# Altium PCB PMP41115.PcbDoc (part 2 of 6)
Units mm, origin at the board's own origin, x right, y up, seen from the top; angles counter-clockwise.
Board outline 102.92 x 46.74 mm, 4 copper layers (Top Layer, Signal Layer 1, Signal Layer 2, Bottom Layer), stack 1.016 mm thick; 174 components, 114 nets, 547 pads, 2622 vias.
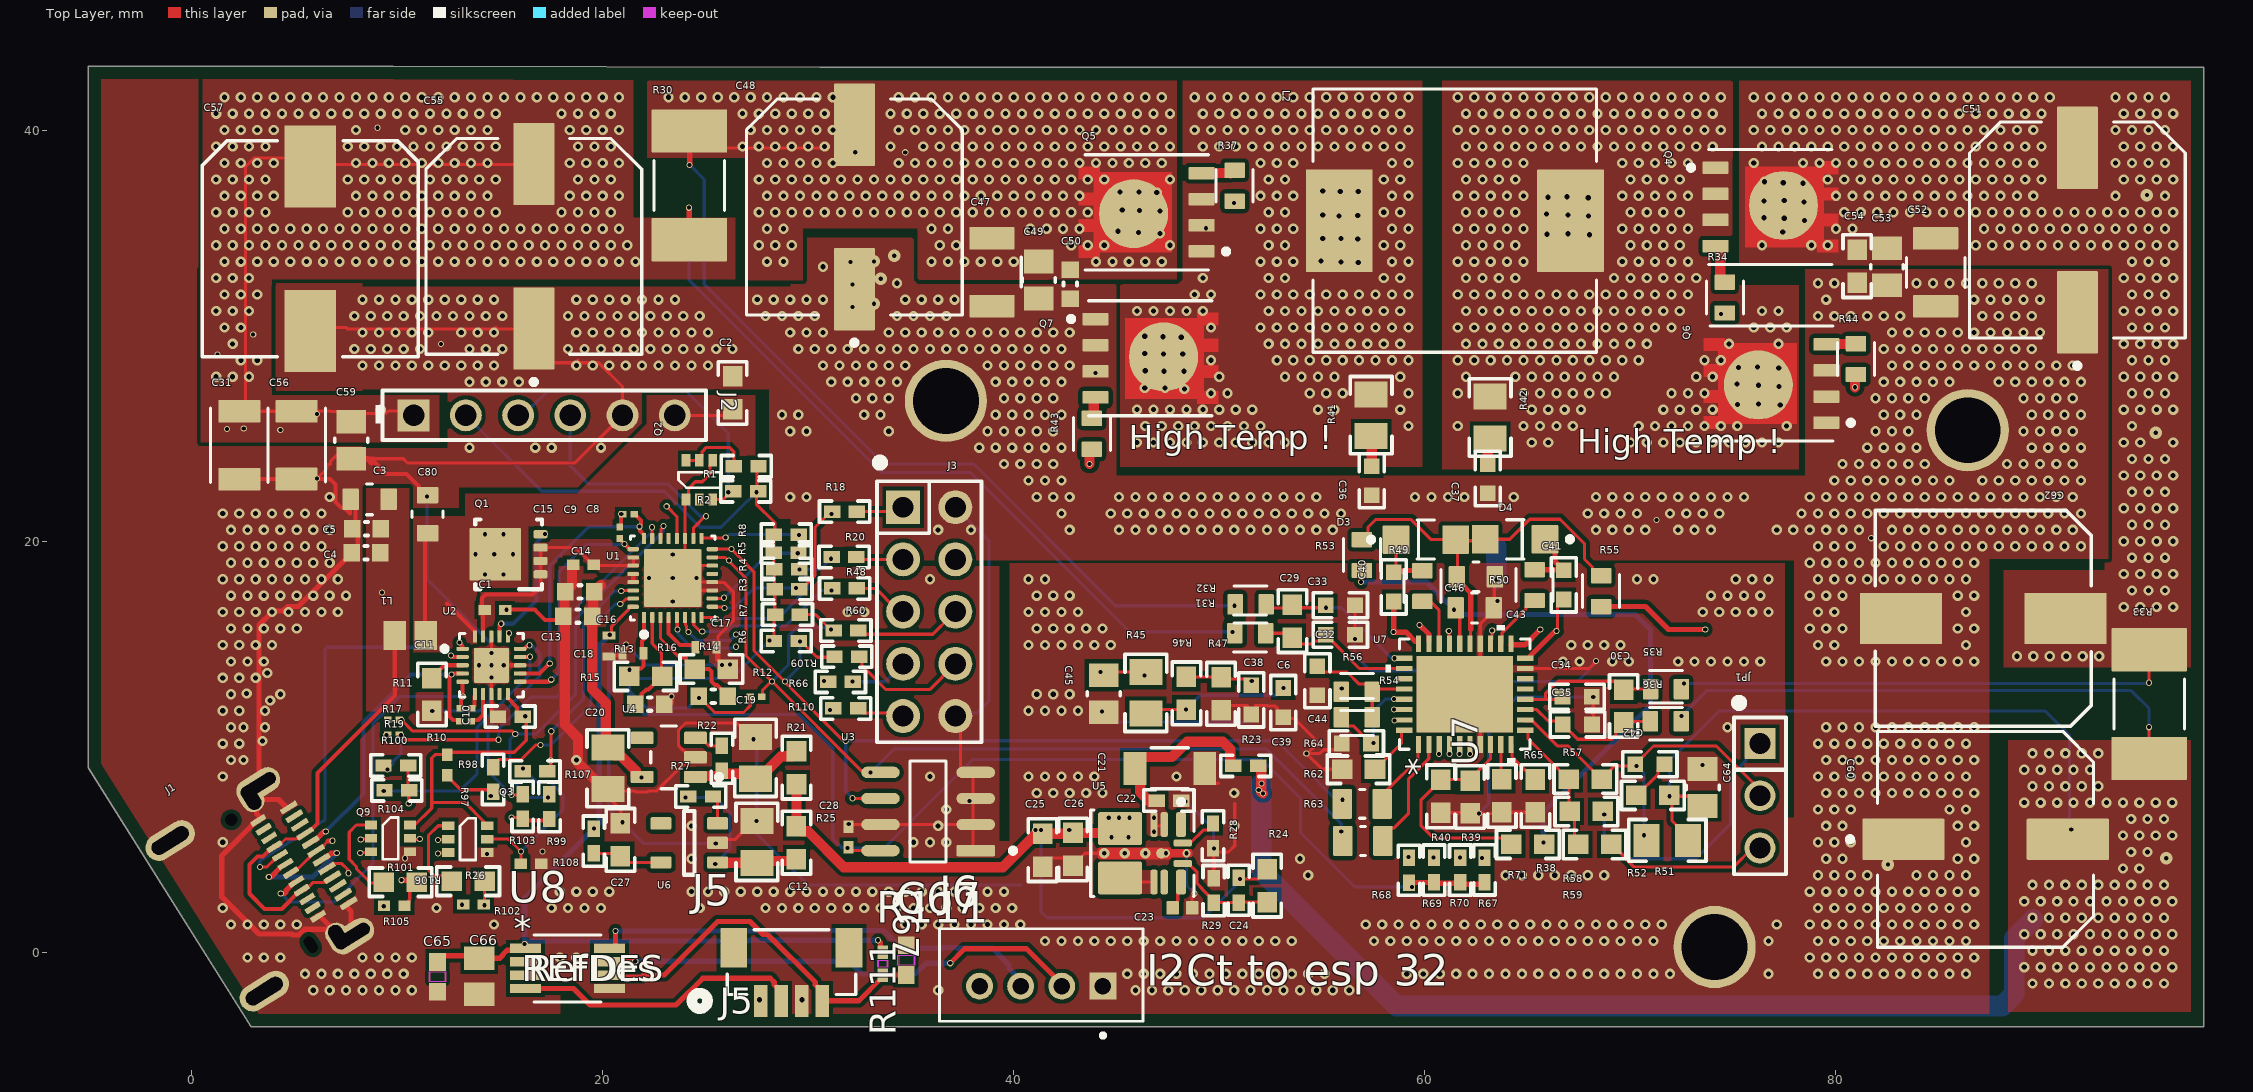
[diagram p0: Top Layer view]

## Part data (continued)
C29 C30: library part CMP-0006944-4, "CAP, CERM, 0.47 uF, 16 V, +/- 10%, X7R, 0603", Cap_Case=0603, Manufacturer=Kemet, Supplier Part Number 1=399-4922-1-ND, TempCo=X7R, Tolerance_%=10%, Value1=Unknown, Value2=16V, ValueDisplayed=0.47uF, AEC Category=Q200, AEC Qualified=?, Cap_F=470nF, ComponentLink1Description="Datasheet link", ComponentLink1URL=http://www.kemet.com/kemet/web/homepage/kechome.nsf/vapubfiles/F3102_Y5V.pdf/$file/F3102_Y5V.pdf, CompType=Capacitor, LatestRevisionDate=2017-03-09, MountType=SMT, PackageReference=0603, PartNumber=C0603C474K4RACTU, Polarized=N, Published=2008-06-19, Publisher="Texas Instruments", RoHS=Y, SizeArea_mm2=1.28, SizeAreaWB_mm2=4.68, SizeX_mm=1.6, SizeY_mm=0.8, SizeZ_mm=1, Supplier 1=Digi-Key, Supplier 2=Mouser, Supplier 3=Farnell, Supplier Part Number 2=80-C0603C474K4R, Supplier Part Number 3=1414644, TaMax_C=125°C, TaMin_C=-55°C, Technology=Ceramic, U/M=EA, VDC_V=16V
C31 C56: library part CMP-0093675-1, "4.7uF ±10% 100V Ceramic Capacitor X7S 1210 (3225 Metric)", Manufacturer=Murata, Operating Temperature Range="-55°C to +125°C", TempCo=22%, Temperature Characteristic=X7S, Tolerance_%=10%, ValueDisplayed=4.7uF, AEC Grade="Grade 1", AEC Qualified=Yes, Cap_F=4.7µF, ComponentLink1Description=Datasheet, ComponentLink1URL=https://www.murata.com/en-us/products/productdetail?partno=GCJ32DC72A475KE01%23, Datasheet=https://www.murata.com/en-us/products/productdetail?partno=GCJ32DC72A475KE01%23, Datasheet Path=datasheets/Cap-GCJ32DC72A475KE01L.pdf, HelpURL=https://upverter.com/upn/revision/54580131a15fb126/, Lead Free=Yes, PackageReference=1210, Part Number=GCJ32DC72A475KE01L, PartNumber=GCJ32DC72A475KE01L, RoHS=TRUE, SizeZ_mm=2.3mm, VDC_V=100V
C36 C37: library part CMP-0006722-4, "CAP, CERM, 33 pF, 100 V, +/- 5%, C0G/NP0, 0603", Cap_Case=0603, Manufacturer=AVX, Supplier Part Number 1=478-1143-1-ND, TempCo=C0G/NP0, Tolerance_%=5%, Value1="0.209 ohm", Value2=100V, ValueDisplayed=33pF, AEC Category=Q200, AEC Grade=N/A, AEC Qualified=N, Cap_F=33pF, ComponentLink1Description="Datasheet link", ComponentLink1URL=http://datasheets.avx.com/C0GNP0-Dielectric.pdf, CompType=Capacitor, ESR_ohm=0.209, LatestRevisionDate=2017-03-09, MountType=SMT, PackageReference=0603, PartNumber=06031A330JAT2A, Polarized=N, Published=2008-06-19, Publisher="Texas Instruments", RoHS=Y, SizeArea_mm2=1.28, SizeAreaWB_mm2=4.68, SizeX_mm=1.6, SizeY_mm=0.8, SizeZ_mm=1, Supplier 1=Digi-Key, Supplier 2=Newark, Supplier 3=Mouser, Supplier Part Number 2=96M1221, Supplier Part Number 3=581-06031A330J, TaMax_C=125°C, TaMin_C=-55°C, Technology=Ceramic, U/M=EA, VDC_V=100V
C40 C41: library part CMP-0006753-4, "CAP, CERM, 0.1 uF, 25 V, +/- 10%, X7R, 0603", Cap_Case=0603, Manufacturer=AVX, Supplier Part Number 1=478-3714-1-ND, TempCo=X7R, Tolerance_%=10%, Value1="0.05 ohm", Value2=25V, ValueDisplayed=0.1uF, AEC Category=Q200, AEC Grade=N/A, AEC Qualified=N, Cap_F=100nF, ComponentLink1Description="Datasheet link", ComponentLink1URL=http://datasheets.avx.com/X7RDielectric.pdf, CompType=Capacitor, ESR_ohm=50m, LatestRevisionDate=2017-03-09, MountType=SMT, PackageReference=0603, PartNumber=06033C104KAT2A, Polarized=N, Published=2008-06-19, Publisher="Texas Instruments", RoHS=Y, SizeArea_mm2=1.28, SizeAreaWB_mm2=4.68, SizeX_mm=1.6, SizeY_mm=0.8, SizeZ_mm=1, Supplier 1=Digi-Key, Supplier 2=Newark, Supplier 3=Mouser, Supplier Part Number 2=96M1263, Supplier Part Number 3=581-06033C104KAT2A, TaMax_C=125°C, TaMin_C=-55°C, Technology=Ceramic, U/M=EA, VDC_V=25V
C42: library part CMP-0007130-4, "CAP, CERM, 100 pF, 100 V, +/- 5%, C0G/NP0, AEC-Q200 Grade 1, 0603", Cap_Case=0603, Manufacturer=MuRata, Supplier Part Number 1=490-4771-1-ND, TempCo=C0G/NP0, Tolerance_%=5%, Value1=Unknown, Value2=100V, ValueDisplayed=100pF, AEC Category=Q200, AEC Grade=1, AEC Qualified=Y, Cap_F=100pF, ComponentLink1Description="Datasheet link", ComponentLink1URL=http://psearch.murata.com/capacitor/product/GCM1885C2A101JA16%23.pdf, CompType=Capacitor, LatestRevisionDate=2017-03-09, MountType=SMT, PackageReference=0603, PartNumber=GCM1885C2A101JA16D, Polarized=N, Published=2008-06-19, Publisher="Texas Instruments", RoHS=Y, SizeArea_mm2=1.28, SizeAreaWB_mm2=4.68, SizeX_mm=1.6, SizeY_mm=0.8, SizeZ_mm=1, Supplier 1=Digi-Key, Supplier 2=Mouser, Supplier Part Number 2=81-GCM1885C2A101JA6D, TaMax_C=125°C, TaMin_C=-55°C, Technology=Ceramic, U/M=EA, VDC_V=100V
C43 C46: library part CMP-0093626-1, "Cap Ceramic 4.7uF 25V X7R 10% Pad SMD 0805 +125°C Automotive T/R", Manufacturer="TDK Corporation", Operating Temperature Range="-55°C to +125°C", TempCo=15%, Temperature Characteristic=X7R, Tolerance_%=0.1%, ValueDisplayed=4.7uF, AEC Grade="Grade 1", AEC Qualified=Yes, Cap_F=4.7µF, ComponentLink1Description=Datasheet, ComponentLink1URL=https://product.tdk.com/info/en/catalog/datasheets/mlcc_automotive_soft_en.pdf, Datasheet=https://product.tdk.com/info/en/catalog/datasheets/mlcc_automotive_soft_en.pdf, Datasheet Path=datasheets/Cap-CGA4J1X7R1E475K125AE.pdf, HelpURL=https://upverter.com/upn/revision/748290ea9605f801/, Lead Free=Yes, PackageReference=0805, Part Number=CGA4J1X7R1E475K125AE, PartNumber=CGA4J1X7R1E475K125AE, RoHS=TRUE, SizeZ_mm=1.45mm, VDC_V=25V
C45 C49 C53 C59 C64: library part CMP-0861070-1, "CAP, CERM, 1 µF, 100 V,+/- 10%, X7R, AEC-Q200 Grade 1, 0805", Cap_Case=0805, Manufacturer=AVX, TempCo=X7R, Tolerance_%=10%, Value2=100V, ValueDisplayed=1µF, AEC Category=Q200, AEC Grade=1, AEC Qualified=Y, Cap_F=1µF, ComponentLink1Description="Datasheet link", ComponentLink1URL=http://datasheets.avx.com/AutoMLCC.pdf, CompType=Capacitor, MountType=SMT, PackageReference=0805, PartNumber=08051C105K4Z2A, Polarized=N, RoHS=Y, SizeArea_mm2=2.5, SizeAreaWB_mm2=6.75, SizeX_mm=2, SizeY_mm=1.25, SizeZ_mm=1.5, TaMax_C=125°C, TaMin_C=-55°C, Technology=Ceramic, U/M=EA, VDC_V=100V
C47 C52: library part CMP-0096021-1, "10 µF ±10% 100V Ceramic Capacitor X7R 1210 (3225 Metric)", Digikey Part Number=445-C3225X7R2A106K250ACCT-ND, Manufacturer=TDK, Mouser Part Number=810-C3225X7R2A106K25, Operating Temperature Range="-55°C to +125°C", TempCo=15%, Temperature Characteristic=X7R, Tolerance_%=10%, ValueDisplayed=10uF, AEC Qualified=No, Cap_F=10µF, ComponentLink1Description=Datasheet, ComponentLink1URL=https://product.tdk.com/en/search/capacitor/ceramic/mlcc/info?part_no=C3225X7R2A106K250AC, Datasheet=https://product.tdk.com/en/search/capacitor/ceramic/mlcc/info?part_no=C3225X7R2A106K250AC, Datasheet Path=datasheets/Cap-C3225X7R2A106K250AC.pdf, Digikey Description="COMMERCIAL GRADE GENERAL PURPOSE", HelpURL=https://upverter.com/upn/revision/84742aafcccd6735/, Lead Free=Yes, Mouser Description="Multilayer Ceramic Chip Capacitors, Capacitance=10µF, LxWxT: 3.2x2.5x2.5mm", PackageReference=1210, Part Number=C3225X7R2A106K250AC, PartNumber=C3225X7R2A106K250AC, RoHS=TRUE, SizeZ_mm=2.85mm, Supplier 1=Digikey, Supplier 2=Mouser, Supplier Part Number 1=445-C3225X7R2A106K250ACCT-ND, Supplier Part Number 2=810-C3225X7R2A106K25, VDC_V=100V
C48 C51 C55 C60: library part CMP-0089206-1, "100uF 63V Polymer ALUM Electrolytic Capacitor, CR Series 4000h 10.3x10.3x12.6mm", Digikey Part Number=493-13783-1-ND, Leakage Current=189uA, Manufacturer=Nichicon, Mouser Part Number=647-PCR1J101MCL1GS, Operating Temperature Range="-55°C to +125°C", Tolerance_%=20%, ValueDisplayed=100uF, AEC Grade="Grade 1", AEC Qualified=Yes, Cap_F=100µF, ComponentLink1Description=Datasheet, ComponentLink1URL=https://www.nichicon.co.jp/english/products/pdfs/e-pcr.pdf, Datasheet=https://www.nichicon.co.jp/english/products/pdfs/e-pcr.pdf, Datasheet Path=datasheets/Cap-PCR1J101MCL1GS.pdf, Device Class L1="Passive Components", Device Class L2=Capacitors, Device Class L3="Aluminum Electrolytic Capacitors", Digikey Description="CAP ALUM POLY 100UF 20% 63V SMD", Dissipation Factor=8%, Esr=24m, HelpURL=https://upverter.com/upn/revision/74832c365c15f87b/, IRMS_A=3A, Lead Free=Yes, Life=4000Hours, PackageReference=SMD_RADIAL, Part Number=PCR1J101MCL1GS, PartNumber=PCR1J101MCL1GS, RoHS=TRUE, SizeZ_mm=12.7mm, Supplier 1=Digikey, Supplier 2=Mouser, Supplier Part Number 1=493-13783-1-ND, Supplier Part Number 2=647-PCR1J101MCL1GS, VDC_V=63V
C54: library part CMP-0007237-3, "Multilayer Ceramic Capacitors MLCC - SMD/SMT CGA 0603 100V 100pF C0G 5% AEC-Q200", Cap_Case=0603, Manufacturer=TDK, Supplier Part Number 1=490-1351-1-ND, TempCo=C0G/NP0, Tolerance_%=5%, Value1=Unknown, Value2=100V, ValueDisplayed=100pF, AEC Category=Q200, AEC Qualified=?, Cap_F=100pF, ComponentLink1Description="Datasheet link", ComponentLink1URL=http://search.murata.co.jp/Ceramy/PnsearchViewAction.do?HnOFG=ON&HnNFG=ON&SEL_CNT=50&sLang=en&sKey=GRM1885C2A101JA01D&x=9&y=9&search=startwith, CompType=Capacitor, LatestRevisionDate=2017-03-09, MountType=SMT, PackageReference=0603, PartNumber=CGA3E2C0G2A101J080AA, Polarized=N, Published=2008-06-19, Publisher="Texas Instruments", RoHS=Y, SizeArea_mm2=1.28, SizeAreaWB_mm2=4.68, SizeX_mm=1.6, SizeY_mm=0.8, SizeZ_mm=1, Supplier 1=Digi-Key, Supplier 2=Mouser, Supplier 3=Farnell, Supplier Part Number 2=CGA3E2C0G2A101J080AA, Supplier Part Number 3=1828919, TaMax_C=125°C, TaMin_C=-55°C, Technology=Ceramic, U/M=EA, VDC_V=100V
C57 C62: library part CMP-0012603-3, "CAP, Polymer Hybrid, 56 uF, 63 V, +/- 20%, 30 ohm, 10x10 SMD", Manufacturer=Panasonic, Supplier Part Number 1=P15469CT-ND, Tolerance_%=20%, Value1="30 ohm", Value2=63V, ValueDisplayed=56uF, AEC Category=Q200, AEC Qualified=?, Cap_F=56µF, ComponentLink1Description="Datasheet link", ComponentLink1URL=http://industrial.panasonic.com/www-data/pdf/ABA0000/ABA0000CE138.pdf, CompType=Capacitor, ESR_ohm=30, IRMS_A=1.4A, MountType=SMT, PackageReference=10x10, PartNumber=EEHZC1J560P, Polarized=Y, RoHS=Y, Series=ZC, SizeArea_mm2=113.3, SizeAreaWB_mm2=159.9, SizeX_mm=11, SizeY_mm=10.3, SizeZ_mm=10.2, Supplier 1=Digi-Key, TaMax_C=125°C, TaMin_C=-55°C, Technology="Polymer Hybrid", VDC_V=63V
C65 C67: library part GRM188R72A104KA35J, "CAP, CERM, 0.1 uF, 100 V, +/- 10%, X7R, 0603", Manufacturer_Name=Murata, Copyright="Copyright (C) 2026 Ultra Librarian. All rights reserved.", Manufacturer_Part_Number=GRM188R72A104KA35J
C66: library part C2012X7S2A105K125AB, "1 ÂµF Â±10% 100V Ceramic Capacitor X7S 0805 (2012 Metric)", Package=None, Availability=Unavailable, MF="{'manufacturer': u'TDK Corporation'}", MP=C2012X7S2A105K125AB, Price=None
D3 D4: library part CMP-0093639-2, "Diode Schottky 1A Surface Mount DO-219AB (SMF)", Digikey Part Number=112-V1FM10-M3/HCT-ND, Forward Current=1A, Manufacturer=Vishay, Max Surge Forward Current=30A, Mouser Part Number=78-V1FM10-M3/H, Operating Temperature Range="-40°C to +175°C", Peak Reverse Current=0.2uA, ValueDisplayed=95pF, AEC Category=Q101, AEC Qualified=No, Cap_F=95pF, ComponentLink1Description=Datasheet, ComponentLink1URL=https://www.vishay.com/docs/87557/v1fm10.pdf, CompType=Diode, Datasheet=https://www.vishay.com/docs/87557/v1fm10.pdf, Datasheet Path=datasheets/Diode-V1FM10-M3-H.pdf, Digikey Description="1A 100V SMF TRENCH SKY RECT", HelpURL=https://upverter.com/upn/revision/746fedbc755f5789/, Lead Free=Yes, Mouser Description="Rectifier Diode Schottky 100V 1A 2-Pin SMF T/R", PackageReference=DO-219AB, Part Number=V1FM10-M3/H, PartNumber=V1FM10-M3/H, RoHS=TRUE, SizeZ_mm=1.08mm, Standoff Height=0mm, TJmax_C=175°C, Vf_V=100V, Vr_V=100V
J1: library part CMP-0085712-2, "Receptacle, USB 3.1 Type C, R/A, Gold, SMT", Color=Black, Current_A=1.25A, Manufacturer="JAE Electronics", Voltage_V=20V, ComponentLink1Description="Datasheet URL", ComponentLink1URL=http://www.jae.com/z-en/pdf_download_exec.cfm?param=SJ115946.pdf, CompType=USB, ContactFinish=Gold, Gender=Female, MountType=SMT, Orientation=R/A, PackageReference="Receptacle, USB 3.1 Type C, R/A, SMT", PartNumber=DX07S024JJ2R1300, PinCount=24, Pitch_mm=0.5, RoHS=Y, Row_Count=2
J2: library part CMP-0075621-1, "Receptacle, 6x1, 2.54mm, Tin, TH", Color=Black, Current_A=5.7A, Manufacturer=Samtec, Supplier Part Number 1=SAM1213-06-ND, Cert_CSA=Y, Cert_UL=Y, CNHeader=False, ComponentLink1Description="Datasheet URL", ComponentLink1URL=http://suddendocs.samtec.com/catalog_english/ssw_sm.pdf, CompType=Receptacle, ContactFinish=Tin, CT=False, Gender=Female, LatestRevisionDate=2017-07-12, MountType=TH, Orientation=Vertical, PackageReference="Receptacle, 6x1, 2.54mm, TH", PartNumber=SSW-106-01-T-S, PinCount=6, Pitch_mm=2.54, Publisher="Texas Instruments", RoHS=Y, Row_Count=1, Supplier 1=Digi-Key
J3: library part CMP-0054550-2, "Header, 100mil, 5x2, Tin, TH", Color=Black, Current_A=3A, Manufacturer="Sullins Connector Solutions", Supplier Part Number 1=S2012E-05-ND, Voltage_V=1.8kV, Cert_UL=Y, ClassName=Header, ComponentLink1Description="Datasheet URL", ComponentLink1URL=http://www.sullinscorp.com/catalogs/77_PAGE108-109_.100_MALE_HDR.pdf, CompType=Header, ContactFinish=Tin, Gender=Male, Green_EU RoHS=Passed, Green_EU RoHS-2=Passed, Green_Lifecycle=Active, Green_REACh=Passed, MountType=TH, Orientation=Vertical, PackageReference="Header, 5x2, 100mil, Tin", PartNumber=PEC05DAAN, PinCount=10, Pitch_mm=2.54, RoHS=Y, Row_Count=2, RowSpacing_mm=2.54, Shrouded=N, Supplier 1=Digi-Key
J5: "Description", Manufacturer_Name=JST, Copyright="Copyright (C) 2025 Ultra Librarian. All rights reserved.", Manufacturer_Part_Number=BM04B-SRSS-TB, RefDes=RefDes, Type="Headers, Male Pins"
J6: Package=None, Availability=Unavailable, MF="{'manufacturer': u'JST Sales America Inc.'}", MP=B4B-PH-K-S, Price=None
JP1: library part CMP-0002338-1, "Header, 100mil, 3x1, Tin, TH", Color=Black, Current_A=3A, Manufacturer="Sullins Connector Solutions", Supplier Part Number 1=S1012E-03-ND, Voltage_V=1.8kV, Cert_UL=Y, ClassName=Header, CNHeader=TRUE, ComponentLink1Description="Datasheet URL", ComponentLink1URL=http://www.sullinscorp.com/catalogs/77_PAGE108-109_.100_MALE_HDR.pdf, CompType=Header, ContactFinish=Tin, CT=FALSE, Gender=Male, Green_EU RoHS=Incomplete, Green_EU RoHS-2=Incomplete, Green_Lifecycle="Not Set", Green_REACh=Incomplete, LatestRevisionDate=26/05/2017, MountType=TH, Orientation=Vertical, PackageReference="Header, 3 PIN, 100mil, Tin", PartNumber=PEC03SAAN, PinCount=3, Pitch_mm=2.54, Publisher="Texas Instruments", RoHS=Y, Row_Count=1, Shrouded=N, Supplier 1=Digi-Key
L1: library part CMP-0003072-1, "Ferrite Bead, 22 ohm @ 100 MHz, 6 A, 0805", Manufacturer="Wurth Elektronik", Supplier Part Number 1=732-4637-1-ND, Value1="0.008 ohm", Value2=6A, ValueDisplayed="22 ohm", ComponentLink1Description="Datasheet link", ComponentLink1URL=http://katalog.we-online.de/pbs/datasheet/742792021.pdf, CompType="Ferrite Bead", DCR_ohm=8m, Imax_A=6A, LatestRevisionDate=2017-03-09, MountType=SMT, PackageReference=0805, PartNumber=742792021, Published=2014-04-30, Publisher="Texas Instruments", RoHS=Y, SizeArea_mm2=2.5, SizeAreaWB_mm2=6.75, SizeX_mm=2, SizeY_mm=1.25, SizeZ_mm=1.45, Supplier 1=Digi-Key, Supplier 2=Mouser, Supplier Part Number 2=710-742792021, Ztyp@1GHz_Ohm=40.219, ZTyp@100MHz_Ohm=22
L2: library part CMP-0096007-1, "Power Choke Coil 10uH 20% 9A 22mOhm", Manufacturer=Cyntec, Operating Temperature Range="-55°C to +125°C", Test Frequency=100kHz, Tolerance_%=20%, AEC Qualified=No, ComponentLink1Description=Datasheet, ComponentLink1URL=https://www.cyntec.com/upfile/products/download/CMLB135T-000%20(A6).pdf, Datasheet=https://www.cyntec.com/upfile/products/download/CMLB135T-000%20(A6).pdf, Datasheet Path=datasheets/Ind-CMLB135T-100MS.pdf, DCR_ohm=22m, HelpURL=https://upverter.com/upn/revision/6710307a1186a91b/, Ind_H=10µH, Irms=9A, Isat=10.5A, Lead Free=Yes, Material="Metal Dust", PackageReference=SMT2_13MM45_12Mm6, Part Number=CMLB135T-100MS, PartNumber=CMLB135T-100MS, RoHS=TRUE, SizeZ_mm=5mm, Standoff Height=0mm
Q1: library part CMP-0000826-2, "MOSFET, N-CH, 60 V, 35 A, DNH0008A (VSONP-8)", Alternate Manufacturer=None, Manufacturer="Texas Instruments", Supplier Part Number 1=CSD18543Q3A-ND, Value1=0.01, Value2="11.1 nC", AEC Category=Q101, AEC Qualified=N, ChMode=Enhancement, ChType=N, ComponentLink1Description="Datasheet link", ComponentLink1URL=http://www.ti.com/lit/ds/symlink/csd18543q3a.pdf, CompType=MOSFET, IdsMax_A=35A, MountType=SMT, PackageReference=DNH0008A, PartNumber=CSD18543Q3A, QgTyp_nC=11.1, Rdson45_ohm=12m, RoHS=Y, SizeArea_mm2=10.89, SizeAreaWB_mm2=18.49, SizeX_mm=3.3, SizeY_mm=3.3, SizeZ_mm=0.9, Supplier 1=Digi-Key, VdsMax_V=60V, Vgs_V=20V
Q2 Q3 Q9: library part CMP-0000770-1, "MOSFET, 2-CH, N-CH, 60 V, 0.115 A, SOT-363", Alternate Manufacturer=None, Manufacturer="Fairchild Semiconductor", Supplier Part Number 1=2N7002DWCT-ND, AEC Category=Q101, AEC Qualified=N, ChType=N, ComponentLink1Description="Datasheet link", ComponentLink1URL=https://www.fairchildsemi.com/datasheets/2N/2N7002DW.pdf, CompType=MOSFET, IdsMax_A=115mA, LatestRevisionDate=2017-03-09, LatestRevisionNote="Added parts.", MountType=SMT, PackageReference=SOT-363, PartNumber=2N7002DW, Published=2008-06-19, Publisher="Texas Instruments", RoHS=Y, SizeArea_mm2=4.84, SizeAreaWB_mm2=10.24, SizeX_mm=2.2, SizeY_mm=2.2, SizeZ_mm=1.1, Supplier 1=Digi-Key, Supplier 2=Newark, Supplier 3=Farnell, Supplier Part Number 2=05R0387, Supplier Part Number 3=2464117, U/M=EA, VdsMax_V=60V, Vgs_V=20V
Q4 Q5 Q6 Q7: library part CMP-0096839-1, "N-Channel 80 V 18.6A (Ta), 70.6A (Tc) 5W (Ta), 71.4W (Tc) Surface Mount PowerPAK® SO-8", Digikey Part Number=742-SIR880BDP-T1-RE3CT-ND, Drain To Source Breakdown Voltage=80V, Input Capacitace At Vds="2930pF @ 40V", Manufacturer=Vishay, Mouser Part Number=78-SIR880BDP-T1-RE3, Operating Temperature Range="-55°C to +150°C", Power_W=5W, Pulse Drain Current=200A, Typ Forward Diode Voltage=0.74V, AEC Qualified=No, ChMode=False, ComponentLink1Description=Datasheet, ComponentLink1URL=https://www.vishay.com/docs/63031/sir880bdp.pdf, Datasheet=https://www.vishay.com/docs/63031/sir880bdp.pdf, Datasheet Path=datasheets/Trans-SIR880BDP-T1-RE3.pdf, Digikey Description="N-CHANNEL 80-V (D-S) MOSFET POWE", HelpURL=https://upverter.com/upn/revision/df129d86407baf6e/, IdsMax_A=18.6A, Lead Free=Yes, Number Of Channels=1, Number Of N Channels=1, PackageReference=SO-8, Part Number=SIR880BDP-T1-RE3, PartNumber=SIR880BDP-T1-RE3, QgTyp_nC="43.5nC @ 10V", Rdson45_ohm=5.3m, Reverse Recovery Charge=52nC, Reverse Recovery Time=38ns, RoHS=TRUE, Rthja Max=20°C/W, SizeZ_mm=1.12mm, Threshold Vgs Max=2.4V, Threshold Vgs Min=1V, TJmax_C=+150°C, Transconductance=49S, Turn Off Delay Time=40ns, Turn On Delay Time=12ns, VdsMax_V=1.1V, Vgs_V=20V
R1 R2: library part CMP-0026657-1, "RES, 1.00 k, 1%, 0.1 W, 0402", Manufacturer=Panasonic, Power_W=100mW, Supplier Part Number 1=P1.00KLCT-ND, TempCo="100 ppm/C", Tolerance_%=1%, Value2=0.1W, Value_Code=1k00, ValueDisplayed=1.00k, AEC Category=Q200, AEC Qualified=?, ComponentLink1Description="Datasheet link", ComponentLink1URL=http://industrial.panasonic.com/www-data/pdf/AOA0000/AOA0000CE2.pdf, CompType=Resistor, EIA_Code=E96, LatestRevisionDate=2017-03-09, MountType=SMT, PackageReference=0402, PartNumber=ERJ-2RKF1001X, Published=2008-06-26, Publisher="Texas Instruments", Res_ohm=1k, RoHS=Y, SizeArea_mm2=0.5, SizeX_mm=1, SizeY_mm=0.5, SizeZ_mm=0.6, Supplier 1=Digi-Key, Supplier 2=Newark, Supplier 3=Mouser, Supplier Part Number 2=64R5247, Supplier Part Number 3=667-ERJ-2RKF1001X, Technology="Thick Film", U/M=EA, Value1=1%, VDC_V=50V
R3 R4 R6 R7: library part CMP-0026729-1, "RES, 2.20 k, 1%, 0.063 W, 0402", Manufacturer="Yageo America", Power_W=63mW, Supplier Part Number 1=311-2.20KLRCT-ND, TempCo="100 ppm/C", Tolerance_%=1%, Value2=0.063W, Value_Code=2k20, ValueDisplayed=2.20k, AEC Category=Q200, AEC Grade=N/A, AEC Qualified=N, ComponentLink1Description="Datasheet link", ComponentLink1URL=http://www.yageo.com/documents/recent/PYu-RC_Group_51_RoHS_L_1.pdf, CompType=Resistor, LatestRevisionDate=2017-03-09, MountType=SMT, PackageReference=0402, PartNumber=RC0402FR-072K2L, Published=2008-06-26, Publisher="Texas Instruments", Res_ohm=2.2k, RoHS=Y, SizeArea_mm2=0.5, SizeX_mm=1, SizeY_mm=0.5, SizeZ_mm=0.6, Supplier 1=Digi-Key, Supplier 2=Newark, Supplier 3=Mouser, Supplier Part Number 2=67R9903, Supplier Part Number 3=603-RC0402FR-072K2L, Technology="Thick Film", U/M=EA, Value1=1%
R5 R8: library part CMP-0026769-1, "RES, 10.0 k, 0.5%, 0.063 W, 0402", Manufacturer=Vishay-Dale, Power_W=63mW, Supplier Part Number 1=541-10KAVCT-ND, TempCo="50 ppm/C", Tolerance_%=0.5%, Value2=0.063W, Value_Code=10k0, ValueDisplayed=10.0k, AEC Category=Q200, AEC Qualified=?, ComponentLink1Description="Datasheet link", ComponentLink1URL=http://www.vishay.com/docs/20036/dcrcwpe3.pdf, CompType=Resistor, EIA_Code=E192, LatestRevisionDate=2017-03-09, MountType=SMT, PackageReference=0402, PartNumber=CRCW040210K0DHEDP, Published=2008-06-26, Publisher="Texas Instruments", Res_ohm=10k, RoHS=Y, SizeArea_mm2=0.5, SizeX_mm=1, SizeY_mm=0.5, SizeZ_mm=0.6, Supplier 1=Digi-Key, Supplier 2=Newark, Supplier 3=Mouser, Supplier Part Number 2=51X8307, Supplier Part Number 3=71-CRCW040210K0DHEDP, Technology="Thick Film", U/M=EA, Value1=0.5%, VDC_V=50V
R10 R11 R17 R19: library part CMP-0027008-4, "RES, 0, 5%, 0.05 W, 0201", Manufacturer=Vishay-Dale, Power_W=50mW, Supplier Part Number 1=72M6743, TempCo=ppm/C, Tolerance_%=5%, Value2=0.05W, Value_Code=0000, ValueDisplayed=0, AEC Category=Q200, AEC Grade=N/A, AEC Qualified=N, ComponentLink1Description="Datasheet link", ComponentLink1URL=http://www.vishay.com/docs/20052/crcw0201e3.pdf, CompType=Resistor, EIA_Code=E24, MountType=SMT, PackageReference=0201, PartNumber=CRCW02010000Z0ED, Res_ohm=0, RoHS=E, SizeArea_mm2=0.18, SizeX_mm=0.6, SizeY_mm=0.3, SizeZ_mm=0.26, Supplier 1=Newark, Technology="Thick Film", Value1=5%